# Altium PCB Interface_PCB.PcbDoc
Units mm, origin at the board's own origin, x right, y up, seen from the top; angles counter-clockwise.
Board outline 101.22 x 49 mm, 2 copper layers (Top Layer, Bottom Layer), stack 1.448 mm thick; 19 components, 12 nets, 82 pads, 20 vias.
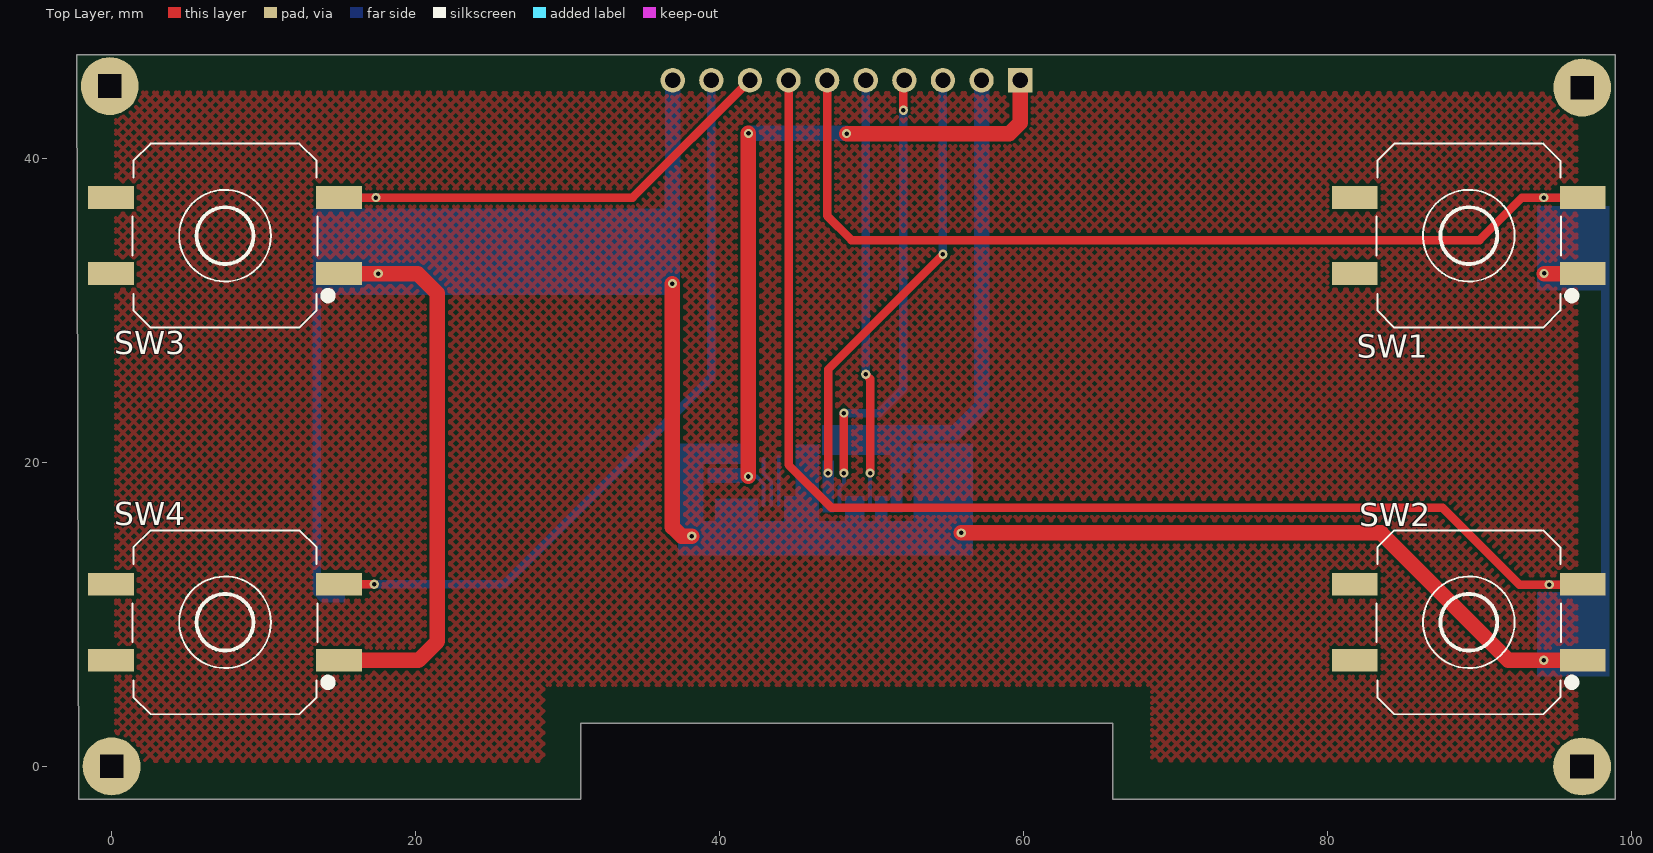
[diagram p0: Top Layer view]
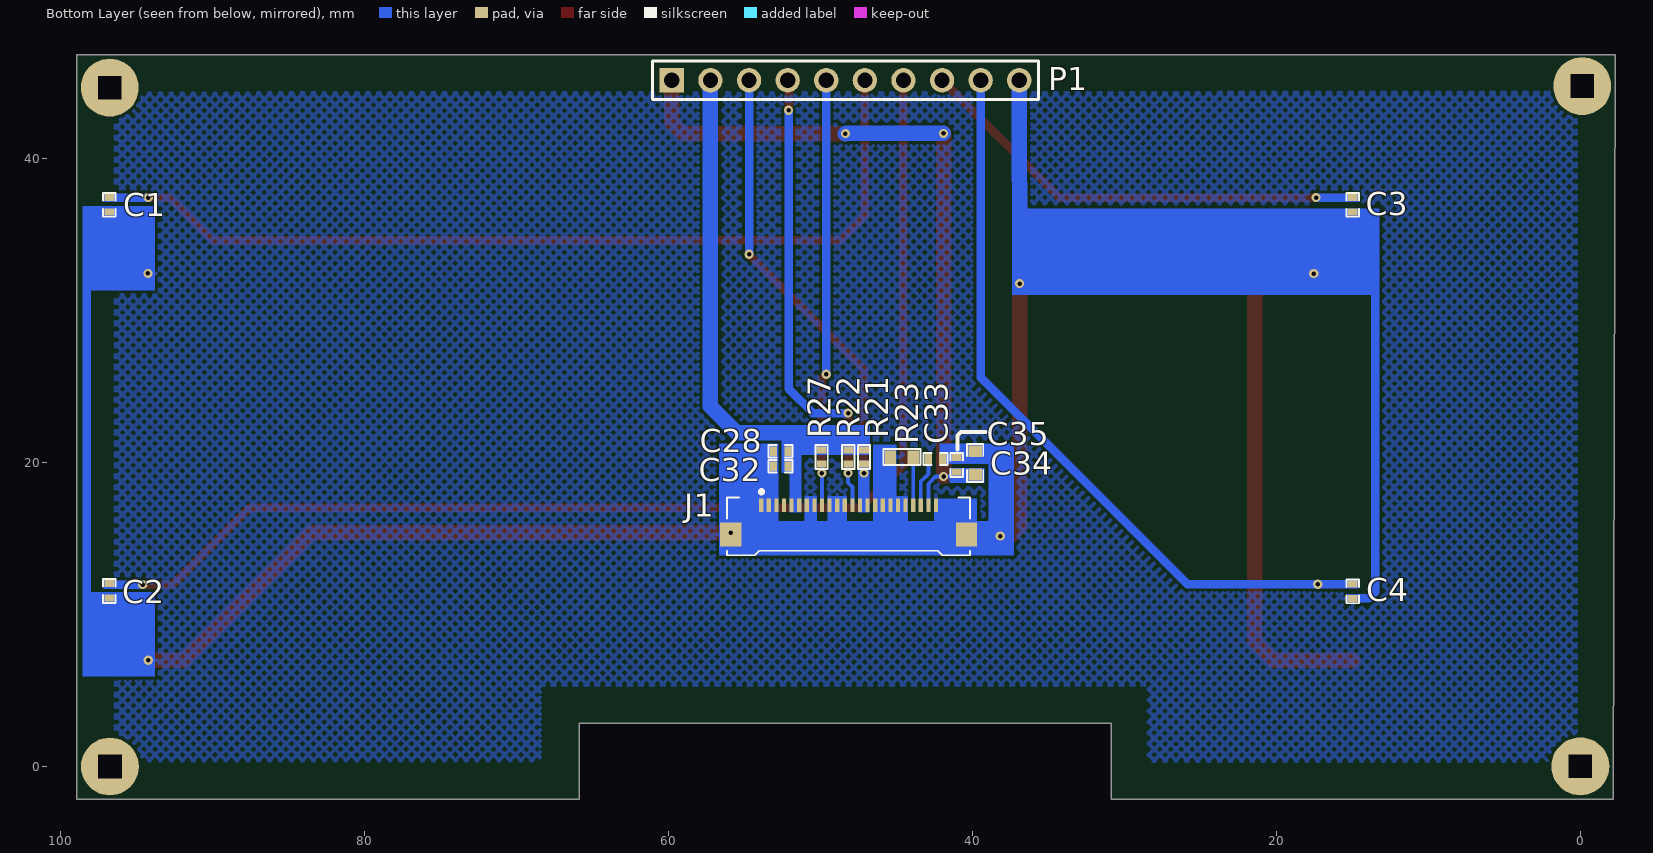
[diagram p1: Bottom Layer view, seen from below]
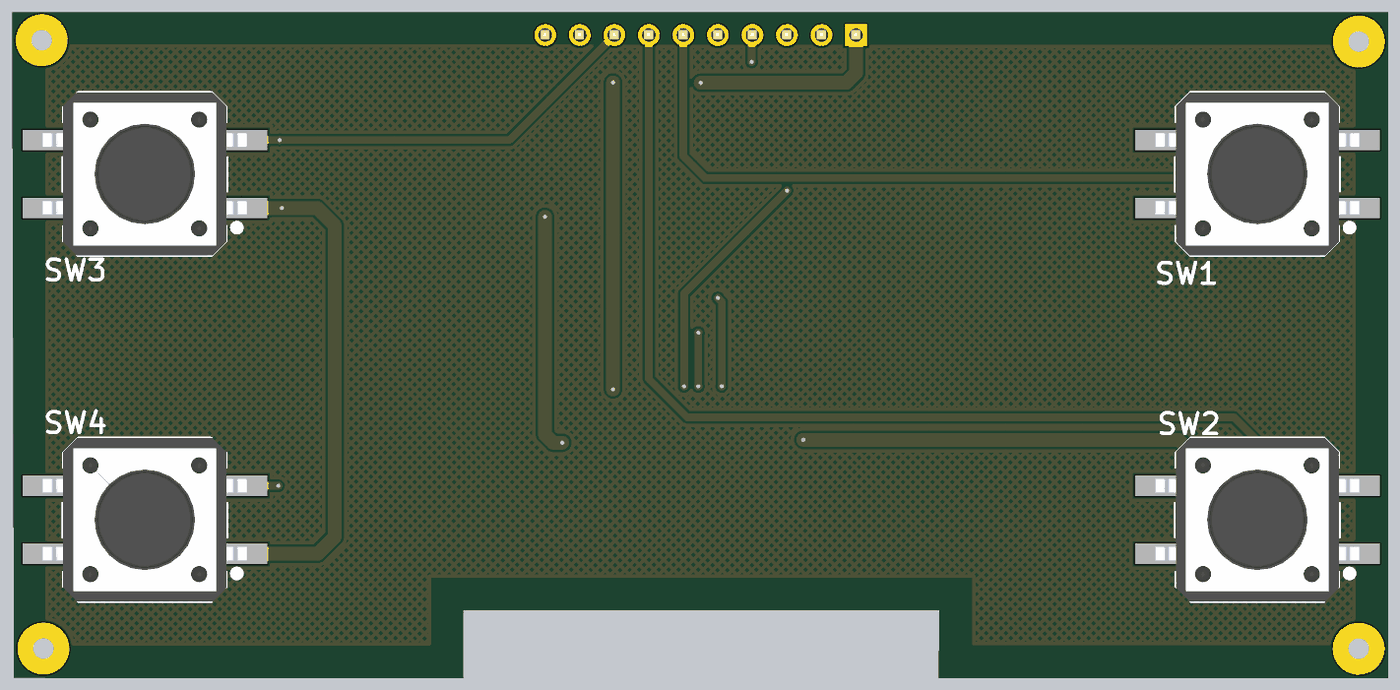
[diagram p2: 3D render of the assembled board from above, using the file's embedded part models]
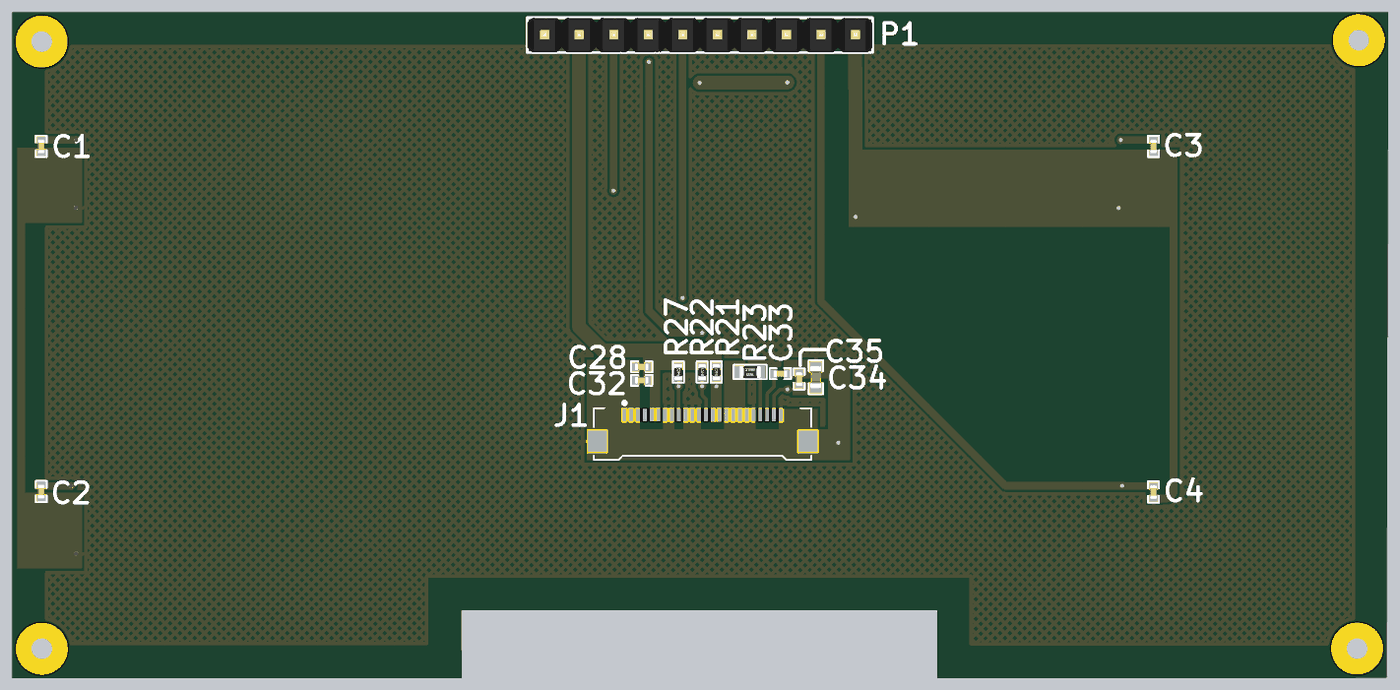
[diagram p3: 3D render of the assembled board from below, using the file's embedded part models]

## Layer stack, top to bottom
Top Solder: solder mask 0.0762, Solder Resist, Dk 3.5
Top Layer: signal copper 0.254
Dielectric 1: dielectric 0.9398, FR-4, Dk 4.8
Bottom Layer: signal copper 0.254
Bottom Solder: solder mask 0.0762, Solder Resist, Dk 3.5

## Board outline
-2.169,-2.159 -2.296,46.815 98.923,46.815 98.923,-2.181 98.912,-2.17 65.874,-2.17 65.876,2.823 30.872,2.823 30.874,2.801 30.874,-2.17

## Design rules (kind name [scope] priority, off if disabled: settings)
Clearance [All] p1: gap=0.178 ignorepadtopadclearanceinfootprint=FALSE except(0: Arc-Hole Track-Hole SMDPad-Hole THPad-Hole Via-Hole Fill-Hole Poly-Hole Region-Hole Text-Hole; 0.102: Arc-SMDPad Track-SMDPad SMDPad-SMDPad)
HoleToHoleClearance [All] p1: gap=0 allowstackedmicrovias=TRUE
MinimumSolderMaskSliver [All] p1: minsoldermaskwidth=0
PolygonConnect [All] p1: connectstyle=Relief reliefconductorwidth=0.254 reliefentries=4 polygonreliefangle="90 Angle" airgapwidth=0.254
RoutingVias [All] p1: holewidth=0.3 width=0.6 viastyle="Through Hole" minholewidth=0.3 minwidth=0.6 maxholewidth=0.3 maxwidth=0.6
SilkToSilkClearance [All] p1: silktosilkclearance=0
SilkToSolderMaskClearance [IsPad] p1: minsilkscreentomaskgap=0 clearancetoexposedcopper=TRUE
SolderMaskExpansion [All] p1: expansion=0.102 istentingtop=FALSE
Width [All] p1: maxlimit=1.016 minlimit=0.254 preferedwidth=0.559
26 further rules are at their usual default settings.

## Classes and differential pairs
component class U_OLED_Section: C28 C32 C33 C34 C35 J1 R21 R22 R23 R27
component class U_Connector_Section: P1
component class U_Button_Section: C1 C2 C3 C4 SW1 SW2 SW3 SW4

## Components (designator, comment, footprint, x,y, rotation, side; value= is the part's Value field where it differs from the comment)
C1 "0.1uF" "Cap 0402" 96.788,36.947 r270 bottom
C2 "0.1uF" "Cap 0402" 96.788,11.545 r270 bottom
C3 "0.1uF" "Cap 0402" 14.972,36.945 r270 bottom
C4 "0.1uF" "Cap 0402" 14.972,11.516 r270 bottom
C28 "1uF" "Cap 0402" 52.612,20.73 r0 bottom
C32 "1uF" "Cap 0402" 52.612,19.737 r0 bottom
C33 "2.2uF" "Cap 0402" 42.422,20.222 r180 bottom
C34 "4.7uF" "Cap 0603" 39.815,19.963 r90 bottom
C35 "0.1uF" "Cap 0402" 41.035,19.835 r90 bottom
J1 "8.02A0.024200" 8.02A0.024200 48.142,16.214 r180 bottom
P1 "M20-9991045" HDR1X10 59.772,45.139 r180 bottom
R21 "4.7K" Res0402 47.131,20.349 r90 bottom
R22 "4.7K" Res0402 48.172,20.349 r90 bottom
R23 "910K" Res0603 44.642,20.349 r180 bottom
R27 "4.7K" Res0402 49.923,20.349 r90 bottom
SW1 "TS-1103S-C-C" TS-1103S-C-C 89.295,34.917 r180 top locked
SW2 "TS-1103S-C-C" TS-1103S-C-C 89.295,9.477 r180 top locked
SW3 "TS-1103S-C-C" TS-1103S-C-C 7.456,34.917 r180 top locked
SW4 "TS-1103S-C-C" TS-1103S-C-C 7.456,9.477 r180 top locked

## Footprints (in the part's own frame and the unit in brackets; to place one, negate y for a bottom-side part, rotate by r counter-clockwise, add the part's x,y. Pads: shape width x height; smd on the part's side, far side on the other; paste and mask are expansions set on the pad)
8.02A0.024200 [mm]
  rect 0.28x0.9 smd: 1(-5.75,0.968) 2(-5.25,0.968) 3(-4.75,0.968) 4(-4.25,0.968) 5(-3.75,0.968) 6(-3.25,0.968) 7(-2.75,0.968) 8(-2.25,0.968) 9(-1.75,0.968) 10(-1.25,0.968) 11(-0.75,0.968) 12(-0.25,0.968) 13(0.25,0.968) 14(0.75,0.968) 15(1.25,0.968) 16(1.75,0.968) 17(2.25,0.968) 18(2.75,0.968) 19(3.25,0.968) 20(3.75,0.968) 21(4.25,0.968) 22(4.75,0.968) 23(5.25,0.968) 24(5.75,0.968)
  rect 1.4x1.57 smd: MP1(-7.75,-0.967) MP2(7.75,-0.967)
  silkscreen extent -8,-2.33 8,1.96
"Cap 0402" [mil]
  rect 18x25 smd mask+2.36: 1(-18.5,0) 2(18.5,0)
  silkscreen extent -31,-16 31,16, body extent -20,-10 20,10, height 19
"Cap 0603" [mil]
  rect 30x35 smd mask+2.36: 1(-30,0) 2(30,0)
  silkscreen extent -49,-21 49,21, body extent -32,-16 31,16, height 34
HDR1X10 [mm] "Connector; Header; 10 Position"
  rect 1.6x1.6 hole 1: 1(0,0)
  round 1.6 hole 1: 2(2.54,0) 3(5.08,0) 4(7.62,0) 5(10.16,0) 6(12.7,0) 7(15.24,0) 8(17.78,0) 9(20.32,0) 10(22.86,0)
  silkscreen extent -1.27,-1.27 24.13,1.27, body extent -1.27,-1.27 24.13,1.27, height 9.4
Res0402 [mil]
  rect 18x25 smd mask+4: 1(-18.5,0) 2(18.5,0)
  silkscreen extent -32,-17 32,16, body extent -23,-11 23,11, height 16
Res0603 [mil]
  rect 30x35 smd: 1(-30,0) 2(30,0)
  silkscreen extent -48,-21 48,21, body extent -31,-17 31,17, height 18
TS-1103S-C-C [mm]
  rect 3x1.5 smd: 1(-7.5,2.5) 2(7.5,2.5) 3(-7.5,-2.5) 4(7.5,-2.5)
  silkscreen extent -7.03,-6.05 6.08,6.05, body extent -7.5,-6 7.5,6, height 4.4

## Part data
C1 C2 C3 C4 C35: library part CC0402KRX7R7BB104, "CAP CER 0.1UF 16V X7R 0402", Capacitance=100nF, Case Code (Imperial)=0402, Case Code (Metric)=1005, Dielectric=X7R, Manufacturer=Yageo, Max Operating Temperature=125°C, Min Operating Temperature=-55°C, Package Quantity=1, Supplier Part Number 1=311-1338-1-ND, Tolerance=10%, Voltage=16V, Case/Package=0402, ComponentLink1Description=http://www.yageo.com/documents/recent/UPY-GPHC_X7R_6.3V-to-50V_8.pdf?src-supplier=Avnet+Europe, ComponentLink1URL=http://www.yageo.com/documents/recent/UPY-GPHC_X7R_6.3V-to-50V_8.pdf?src-supplier=Avnet+Europe, ComponentLink2Description=http://www.yageo.com/documents/recent/UPY-GPHC_X7R_6.3V-to-50V_18.pdf?src-supplier=Digi-Key, ComponentLink2URL=http://www.yageo.com/documents/recent/UPY-GPHC_X7R_6.3V-to-50V_18.pdf?src-supplier=Digi-Key, ComponentLink3Description=http://www.yageo.com/documents/recent/UPY-GPHC_X7R_6.3V-to-50V_8.pdf?src-supplier=Avnet, ComponentLink3URL=http://www.yageo.com/documents/recent/UPY-GPHC_X7R_6.3V-to-50V_8.pdf?src-supplier=Avnet, ComponentLink4Description=http://www.yageo.com/documents/recent/UPY-GPHC_X7R_6.3V-to-50V_18.pdf?src-supplier=Mouser, ComponentLink4URL=http://www.yageo.com/documents/recent/UPY-GPHC_X7R_6.3V-to-50V_18.pdf?src-supplier=Mouser, ComponentLink5Description=http://www.farnell.com/datasheets/2167236.pdf?src-supplier=Element14, ComponentLink5URL=http://www.farnell.com/datasheets/2167236.pdf?src-supplier=Element14, ComponentLink6Description=http://www.farnell.com/datasheets/1489800.pdf?src-supplier=Element14, ComponentLink6URL=http://www.farnell.com/datasheets/1489800.pdf?src-supplier=Element14, Composition=Ceramic, Depth=0.5mm, Halogen Free="Halogen Free", Height=0.5mm, Lead Free="Lead Free", Length=1mm, Manufacturer Part Number=CC0402KRX7R7BB104, Mount="Surface Mount", Number of Pins=2, Packaging="Tape and Reel", Pricing 1="1=0.1, 10=0.034, 100=0.015, 500=0.0107, 1000=0.00841, 2500=0.00764, 5000=0.00703 (USD)", Radiation Hardening=No, REACH SVHC="No SVHC", Stock 1=16982736, Supplier 1=Digi-Key, Termination=SMD/SMT, Thickness=0.022inch, Voltage Rating=16V, Voltage Rating (DC)=16V, Width=0.02inch
C28 C32: library part GRM155R61E105KA12D, "CAP CER 1UF 25V X5R 0402", Case Code (Imperial)=0402, Case Code (Metric)=1005, Dielectric=X5R, Manufacturer=Murata, Max Operating Temperature=85°C, Min Operating Temperature=-55°C, Package Quantity=10000, Supplier Part Number 1=490-10017-1-ND, Tolerance=10%, Voltage=25V, Capacitance=1uF, Case/Package=0402, ComponentLink1Description=http://www.farnell.com/datasheets/2048341.pdf?src-supplier=Element14, ComponentLink1URL=http://www.farnell.com/datasheets/2048341.pdf?src-supplier=Element14, Depth=0.5mm, Height=0.5mm, Lead Free="Lead Free", Length=1mm, Manufacturer Part Number=GRM155R61E105KA12D, Material=Ceramic, Mount="Surface Mount", Packaging="Tape and Reel", Pricing 1="1=0.11, 10=0.077, 100=0.0363, 500=0.02546, 1000=0.02108, 2500=0.01962, 5000=0.01795 (USD)", REACH SVHC="No SVHC", Stock 1=1194305, Supplier 1=Digi-Key, Termination=SMD/SMT, Thickness=0.022inch, Voltage Rating=25V, Voltage Rating (DC)=25V, Weight=0.000212oz, Width=0.5mm
C33: library part EMK105ABJ225KV-F, "CAP CER 2.2UF 16V X5R 0402", Case Code (Imperial)=0402, Case Code (Metric)=1005, Manufacturer="Taiyo Yuden", Max Operating Temperature=85°C, Min Operating Temperature=-55°C, Supplier Part Number 1=587-6002-1-ND, Tolerance=10%, Voltage Rating=16V, Capacitance=2.2uF, Case/Package=0402, ComponentLink1Description=http://ds.yuden.co.jp/TYCOMPAS/ut/detail.do?productNo=EMK105ABJ225KV-F&amp;fileName=EMK105ABJ225KV-F_SS&amp;mode=specSheetDownload&src-supplier=Digi-Key, ComponentLink1URL=http://ds.yuden.co.jp/TYCOMPAS/ut/detail.do?productNo=EMK105ABJ225KV-F&amp;fileName=EMK105ABJ225KV-F_SS&amp;mode=specSheetDownload&src-supplier=Digi-Key, ComponentLink2Description="https://ds.yuden.co.jp/TYCOMPAS/ut/detail?pn=EMK105ABJ225KV-F &amp;u=M&src-supplier=Digi-Key", ComponentLink2URL="https://ds.yuden.co.jp/TYCOMPAS/ut/detail?pn=EMK105ABJ225KV-F &amp;u=M&src-supplier=Digi-Key", Lead Free="Lead Free", Manufacturer Part Number=EMK105ABJ225KV-F, Mount="Surface Mount", Packaging="Tape and Reel", Pricing 1="1=0.2, 10=0.139, 100=0.0706, 500=0.04834, 1000=0.04276, 2500=0.0409, 5000=0.03718 (USD)", Stock 1=755, Supplier 1=Digi-Key
C34: library part CL10A475KA8NQNC, "CAP CER 4.7UF 25V X5R 0603", Case Code (Imperial)=0603, Case Code (Metric)=1608, Dielectric=X5R, Manufacturer=Samsung, Max Operating Temperature=85°C, Min Operating Temperature=-55°C, Package Quantity=1, Supplier Part Number 1=1276-1900-1-ND, Tolerance=10%, Voltage Rating=25V, Capacitance=4.7uF, Case/Package=0603, ComponentLink1Description=http://www.samsungsem.com/kr/support/product-search/mlcc/CL10A475KA8NQNC.jsp?src-supplier=Digi-Key, ComponentLink1URL=http://www.samsungsem.com/kr/support/product-search/mlcc/CL10A475KA8NQNC.jsp?src-supplier=Digi-Key, Contact Plating=Tin, Depth=0.8mm, Lead Free="Lead Free", Length=1.6mm, Manufacturer Part Number=CL10A475KA8NQNC, Mount="Surface Mount", Packaging="Tape and Reel", Pricing 1="1=0.37, 10=0.255, 100=0.1528, 500=0.11456, 1000=0.09675 (USD)", Stock 1=2252340, Supplier 1=Digi-Key, Termination=Wraparound, Thickness=0.035inch, Width=0.031inch
J1: "FPC Connector 0.5mm pitch 24pin 30pin TOP&bottom conduction Zif Smt Lcd/epaper Fpc Ffc Connector", ComponentLink1Description=Alibaba, ComponentLink1URL=https://www.alibaba.com/product-detail/FPC-Connector-0-5mm-pitch-24pin_1600228276659.html, Manufacturer Part No=8.02A0.024200
P1: "CONN HEADER VERT 10POS 2.54MM", Case/Package=SIL, Color=Black, Contact Resistance=25mR, Current Rating=3A, Insulation Resistance=10GR, Manufacturer=Harwin, Max Operating Temperature=105°C, Min Operating Temperature=-40°C, Package Quantity=500, Supplier Part Number 1=952-1842-ND, ComponentLink1Description=http://www.mouser.com/ds/2/181/Harwin_Product_Catalog_page_206-1134556.pdf?src-supplier=Mouser, ComponentLink1URL=http://www.mouser.com/ds/2/181/Harwin_Product_Catalog_page_206-1134556.pdf?src-supplier=Mouser, ComponentLink2Description=http://www.farnell.com/cad/689114.pdf?src-supplier=Element14, ComponentLink2URL=http://www.farnell.com/cad/689114.pdf?src-supplier=Element14, Connector Type="Male Pin", Contact Material=Brass,Bronze, Contact Mating Length=0.24inch, Contact Plating=Gold, Depth=2.54mm, Gender=Male, Height=0.125inch, Housing Color=Black, Housing Material=Nylon, Length=25.4mm, Manufacturer Part Number=M20-9991045, Max Current Rating=3A, Mount="Through Hole", Number of Contacts=10, Number of Positions=10, Number of Rows=1, Orientation=Straight, Packaging=Bulk, Pitch=2.54mm, Pricing 1="1=0.44, 10=0.413, 100=0.2891, 500=0.2478, 1000=0.2065, 5000=0.177, 10000=0.1652 (USD)", Radiation Hardening=No, REACH SVHC="No SVHC", Stock 1=1623, Supplier 1=Digi-Key, Termination=Solder, Weight=0.020459oz, Width=0.5inch
R21 R22 R27: library part CR0402JF0472G, "4.7K ±5% 1/16W ±200ppm/°C 0402 Chip Resistor - Surface Mount RoHS", Manufacturer="LIZ Elec", Package=0402, Manufacturer Part No=CR0402JF0472G
R23: library part 0603WAF9103T5E, "±1% 1/10W Thick Film Resistors 75V ±100ppm/℃ -55℃~+155℃ 910kΩ 0603 Chip Resistor - Surface Mount ROHS", Manufacturer=UNI-ROYAL, Package=0603, ComponentLink1Description=LCSC, ComponentLink1URL=https://lcsc.com/product-detail/Chip-Resistor-Surface-Mount_UNI-ROYAL-Uniroyal-Elec-0603WAF9103T5E_C23263.html, Manufacturer Part No=0603WAF9103T5E
SW1 SW2 SW3 SW4: "No NO 50mA 12mm 100mΩ 200000 260gf 12V -30℃~+85℃ 12mm 5mm Black Round Button Brick nogging SPST SMD Tactile Switches ROHS", Manufacturer=XKB, Package=Custom, ComponentLink1Description=LCSC, ComponentLink1URL=https://lcsc.com/product-detail/Tactile-Switches_XKB-Connectivity-TS-1103S-C-C_C318916.html, Manufacturer Part No=TS-1103S-C-C

## Free pads (board coordinates)
  round 3.81 hole 1.524 square: MH1(0,0) MH2(-0.127,44.758) MH3(96.754,44.656) MH4(96.743,-0.011)

## Via types
v1: diameter 0.6, hole 0.3, Top Layer to Bottom Layer, tented both sides, 20 vias

## Nets (pads, with @x,y where several pads share a name; then routed paths per layer and width w, separated by ;. In a path a pad name is that pad's centre, name@x,y a point inside that pad or via, vN(x,y) a via of type N, cw(c..) or ccw(c..) an arc to the next point about the centre after c; other vN are vias at no path point)
3V3: C28.1 C32.1 J1.5 J1.6 P1.2 R21.2 R22.2 R27.2 | length 29
  Bottom Layer w1.016: 50.458,21.935 51.643,21.935 55.494,21.935 57.232,23.674 P1.2
BUTTON1: C1.1 P1.6 SW1.3 | length 62.7
  Top Layer w0.559: P1.6 47.072,36.227 48.673,34.625 89.997,34.625 92.789,37.417 v1(94.225,37.417) SW1.3@96.49,37.417
  Bottom Layer w0.559: v1@94.236,37.417 v1(94.225,37.417) C1.1
BUTTON2: C2.1 P1.7 SW2.3 | length 83
  Top Layer w0.559: P1.7 44.532,19.833 47.355,17.01 87.562,17.01 92.614,11.959 v1(94.587,11.959) 96.776,11.959 SW2.3
  Bottom Layer w0.559: v1(94.587,11.959) C2.1@96.781,11.959
BUTTON3: C3.1 P1.8 SW3.3 | length 32.6
  Top Layer w0.559: SW3.3 34.27,37.417 P1.8
  Bottom Layer w0.559: C3.1@14.983,37.41 17.371,37.41 v1(17.379,37.417)
BUTTON4: C4.1 P1.9 SW4.3 | length 52
  Top Layer w0.559: SW4.3 v1(17.278,11.977)
  Bottom Layer w0.559: C4.1@14.996,11.97 17.27,11.97 v1(17.278,11.977) 25.853,11.977 39.452,25.576 P1.9
GND: C1.2 C2.2 C3.2 C4.2 C28.2 C32.2 C33.2 C34.2 C35.2 J1.1 J1.2 J1.3 J1.7 J1.8 J1.10 J1.11 J1.12 J1.16 J1.17 J1.18 J1.19 J1.20 J1.24 J1.MP1 J1.MP2 P1.10 R23.1 SW1.1 SW2.1 SW3.1 SW4.1 | length 167.3
  Top Layer w1.016: SW4.1 20.181,6.977 21.426,8.222 21.426,31.116 20.125,32.417 v1(17.54,32.417) SW3.1 ; v1(36.894,31.765) 36.894,15.741 37.489,15.145 v1(38.164,15.145) ; v1(55.894,15.355) 83.517,15.355 91.895,6.977 v1(94.225,6.977) SW2.1 ; v1@94.266,32.417 SW1.1
  Bottom Layer w0.559: 13.499,36.139 13.499,11.462 13.915,11.046 C4.2 ; 98.261,9.905 98.261,35.975
  Bottom Layer w1.016: v1(36.894,31.765) P1.10 36.844,45.071 P1.10@36.894,45.02
  other v1: 94.248,32.435
IREF: J1.21 R23.2 | length 3.2
  Bottom Layer w0.254: R23.2 43.892,20.337 J1.21
OLED_RST: J1.9 P1.5 R27.1 | length 28.9
  Top Layer w0.559: v1(49.612,25.795) 49.612,25.778 49.617,25.778 49.62,25.776 49.62,25.77 49.897,25.493 v1(49.897,19.293) 49.905,19.301 49.905,19.33 v1@49.911,19.336
  Bottom Layer w0.254: J1.9 R27.1@49.892,19.879
  Bottom Layer w0.559: P1.5@49.526,45.038 49.518,45.045 P1.5 v1(49.612,25.795) v1@49.612,25.779
OLED_SCL: J1.13 P1.4 R22.1 | length 31.7
  Top Layer w0.559: v1(48.172,19.293) v1(48.172,23.245) ; v1(52.091,43.165) 52.091,45.063 52.084,45.071 P1.4
  Bottom Layer w0.254: J1.13 47.892,18.381 48.172,18.661 v1(48.172,19.293) R22.1
  Bottom Layer w0.559: v1(48.172,23.245) 50.495,23.245 52.084,24.834 52.084,43.157 v1(52.091,43.165)
OLED_SDA: J1.14 J1.15 P1.3 R21.1 | length 29
  Top Layer w0.559: v1(47.131,19.293) 47.131,26.119 54.692,33.68 v1(54.692,33.691)
  Bottom Layer w0.559: v1(54.692,33.691) P1.3
VCOMH: C33.1 J1.22 | length 3.2
  Bottom Layer w0.254: C33.1 42.892,19.233 43.392,18.733 J1.22
VDD: C34.1 C35.1 J1.23 P1.1 | length 47.2
  Top Layer w1.016: v1(41.896,19.07) 41.896,41.643 v1(41.898,41.645) ; v1(48.35,41.625) 59.066,41.625 59.772,42.331 P1.1
  Bottom Layer w0.254: C35.1 41.123,19.365 41.225,19.264 41.225,19.219 41.374,19.07 v1(41.896,19.07) 42.418,19.07 42.892,18.596 J1.23
  Bottom Layer w1.016: v1(41.898,41.645) 48.33,41.645 v1(48.35,41.625)
pads on no net: J1.4 SW1.2 SW1.4 SW2.2 SW2.4 SW3.2 SW3.4 SW4.2 SW4.4

## Polygon pours and split planes (outlines as drawn)
no net on Top Layer "Polygon_2" (hatched 45Degree grid 0.508 track 0.254, remove dead copper, pour order 4): 0.268,44.335 96.381,44.285 96.381,0.365 68.441,0.365 68.441,5.335 28.411,5.335 28.411,0.355 0.268,0.355
no net on Top Layer "Polygon_1" (hatched 45Degree grid 0.508 track 0.254, remove dead copper, pour order 3): 0.268,44.335 96.381,44.285 96.381,0.365 68.441,0.365 68.441,5.335 28.411,5.335 28.411,0.355 0.268,0.355
no net on Top Layer "NONET_L-01_P-001" (solid, pour order 1): 0.268,44.335
GND on Bottom Layer "Polygon_2" (hatched 45Degree grid 0.508 track 0.254, remove dead copper, pour order 0): 0.268,44.335 96.381,44.285 96.381,0.365 68.441,0.365 68.441,5.335 28.411,5.335 28.411,0.355 0.268,0.355
GND on Bottom Layer "Polygon_2" (hatched 45Degree grid 0.508 track 0.254, remove dead copper, pour order 2): 0.268,44.335 96.381,44.285 96.381,0.365 68.441,0.365 68.441,5.335 28.411,5.335 28.411,0.355 0.268,0.355

## Other copper
Bottom Layer:
  rectangle net GND: 13.222,31.013 37.402,36.715
  rectangle net GND: 93.79,5.903 98.54,11.463
  rectangle net GND: 93.79,31.305 98.54,36.865
  region net GND: 15.36,11.327 14.928,11.327 14.928,10.767 15.36,10.767
  rectangle net GND: 37.275,15.625 38.926,19.995
  rectangle net GND: 37.275,13.855 53.811,16.135
  rectangle net GND: 37.275,19.885 42.178,21.255
  rectangle net GND: 50.229,15.955 51.046,17.785
  rectangle net GND: 48.248,15.955 49.546,17.785
  rectangle net GND: 44.997,17.415 46.546,21.175
  rectangle net GND: 44.235,15.955 46.546,17.785
  rectangle net GND: 39.688,15.755 42.533,17.635
  rectangle net VDD: 39.206,18.635 41.517,19.615
  rectangle net 3V3: 51.558,19.315 52.541,21.485
  rectangle net GND: 52.744,13.855 56.656,21.245
  rectangle net 3V3: 46.75,20.475 51.558,22.445
  rectangle net 3V3: 51.25,16.705 52.037,22.445
  rectangle net OLED_SDA: 46.752,16.702 47.539,20.132
  region net BUTTON2: 97.165,12.241 96.733,12.241 96.733,11.681 97.165,11.681
  region net BUTTON1: 97.194,37.701 96.762,37.701 96.762,37.145 97.194,37.145
  rectangle net BUTTON3: 14.595,37.131 15.026,37.691
  rectangle net BUTTON4: 14.619,11.685 15.05,12.245

## Silkscreen, mask and mechanical layers (free items; w line width, h text height)
Bottom Overlay:
  lines w0.254: 39.116,21.99 40.735,21.99 40.97,21.755 40.97,20.84
Mechanical 1:
  lines w0.254: 40.112,2.833 40.112,17.833 ; 40.112,17.827 56.109,17.827 ; 56.109,2.82 56.109,17.82 ; 18.124,2.83 78.624,2.83 78.624,40.826 18.124,40.826 18.124,2.83
  text "OLED" at 44.756,38.916 h1.52
Mechanical 2:
  circle w0.254: c49.606,45.09 r0.887
  circle w0.254: c47.041,45.1 r0.906
  circle w0.254: c36.881,45.15 r0.903
  lines w0.254: -2.196,7.775 -1.637,7.775 ; -2.169,-2.159 -2.296,46.815 98.923,46.815 ; -2.158,-2.17 30.885,-2.181 ; 30.872,2.823 65.872,2.823 ; 30.874,-2.17 30.874,2.801 ; 65.876,2.823 65.874,-2.17 98.912,-2.17 ; 98.923,-2.181 98.923,46.819 ; 35.636,43.855 35.636,46.41 61.112,46.41 61.112,44.152 61.112,43.855 35.636,43.855

## Dimensions
0,0 to 96.743,-0.011 on Mechanical 1
96.754,44.656 to 96.743,-0.011 on Mechanical 1
30.874,-2.17 to 65.874,-2.17 on Mechanical 1
40.112,17.827 to 18.124,2.83 on Mechanical 1
18.124,40.826 to 78.624,40.826 on Mechanical 1
18.124,40.826 to 18.124,2.83 on Mechanical 1
-2.296,46.815 to -2.169,-2.159 on Mechanical 1
-2.296,46.815 to 98.923,46.815 on Mechanical 1